# Altium PCB FOC.PcbDoc (part 1 of 2)
Units mil, origin at the board's own origin, x right, y up, seen from the top; angles counter-clockwise.
Board outline 3937.01 x 3149.61 mil, 4 copper layers (Top Layer, GND, signal layer 3, Bottom Layer), stack 23.756 mil thick; 133 components, 165 nets, 424 pads, 310 vias.
Unrouted connection lines stored in the file: 26.
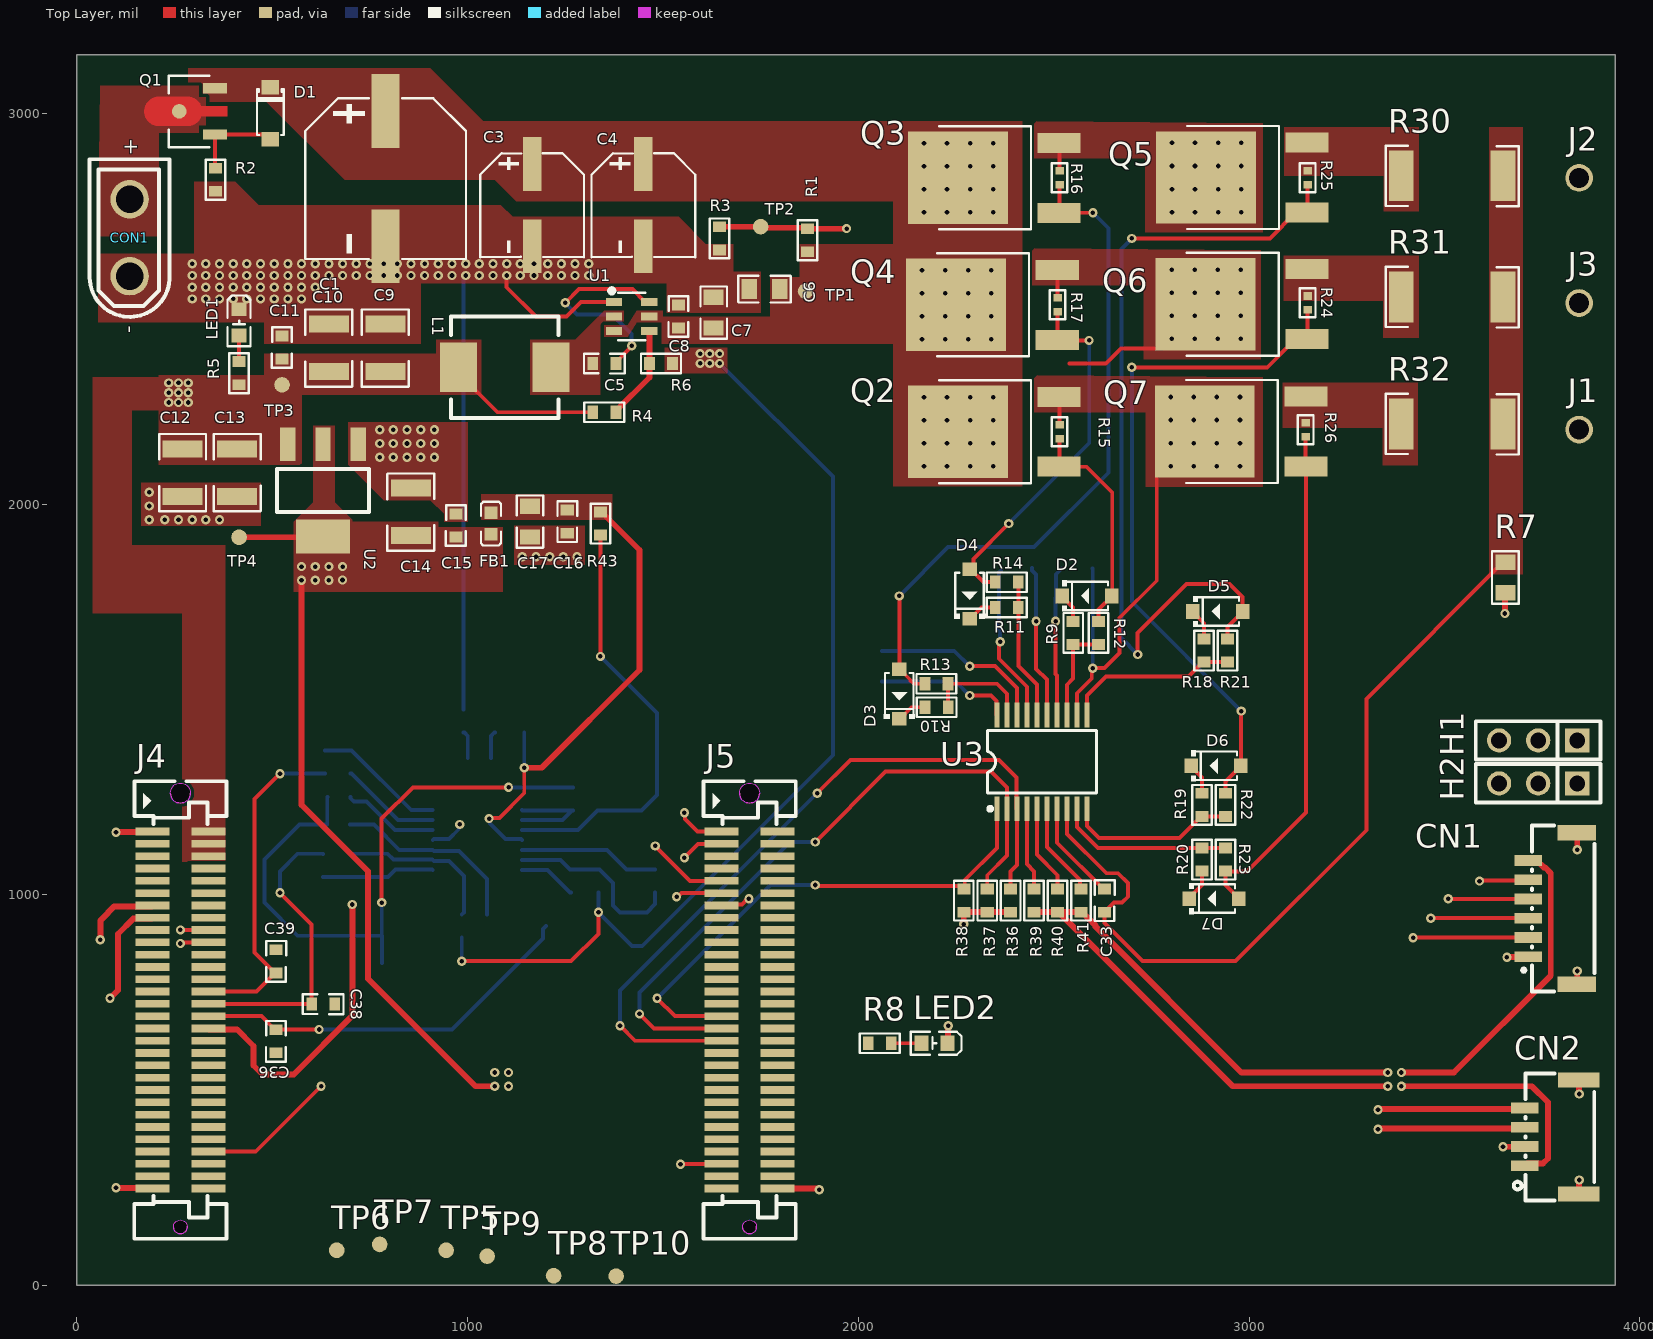
[diagram p0: Top Layer view]
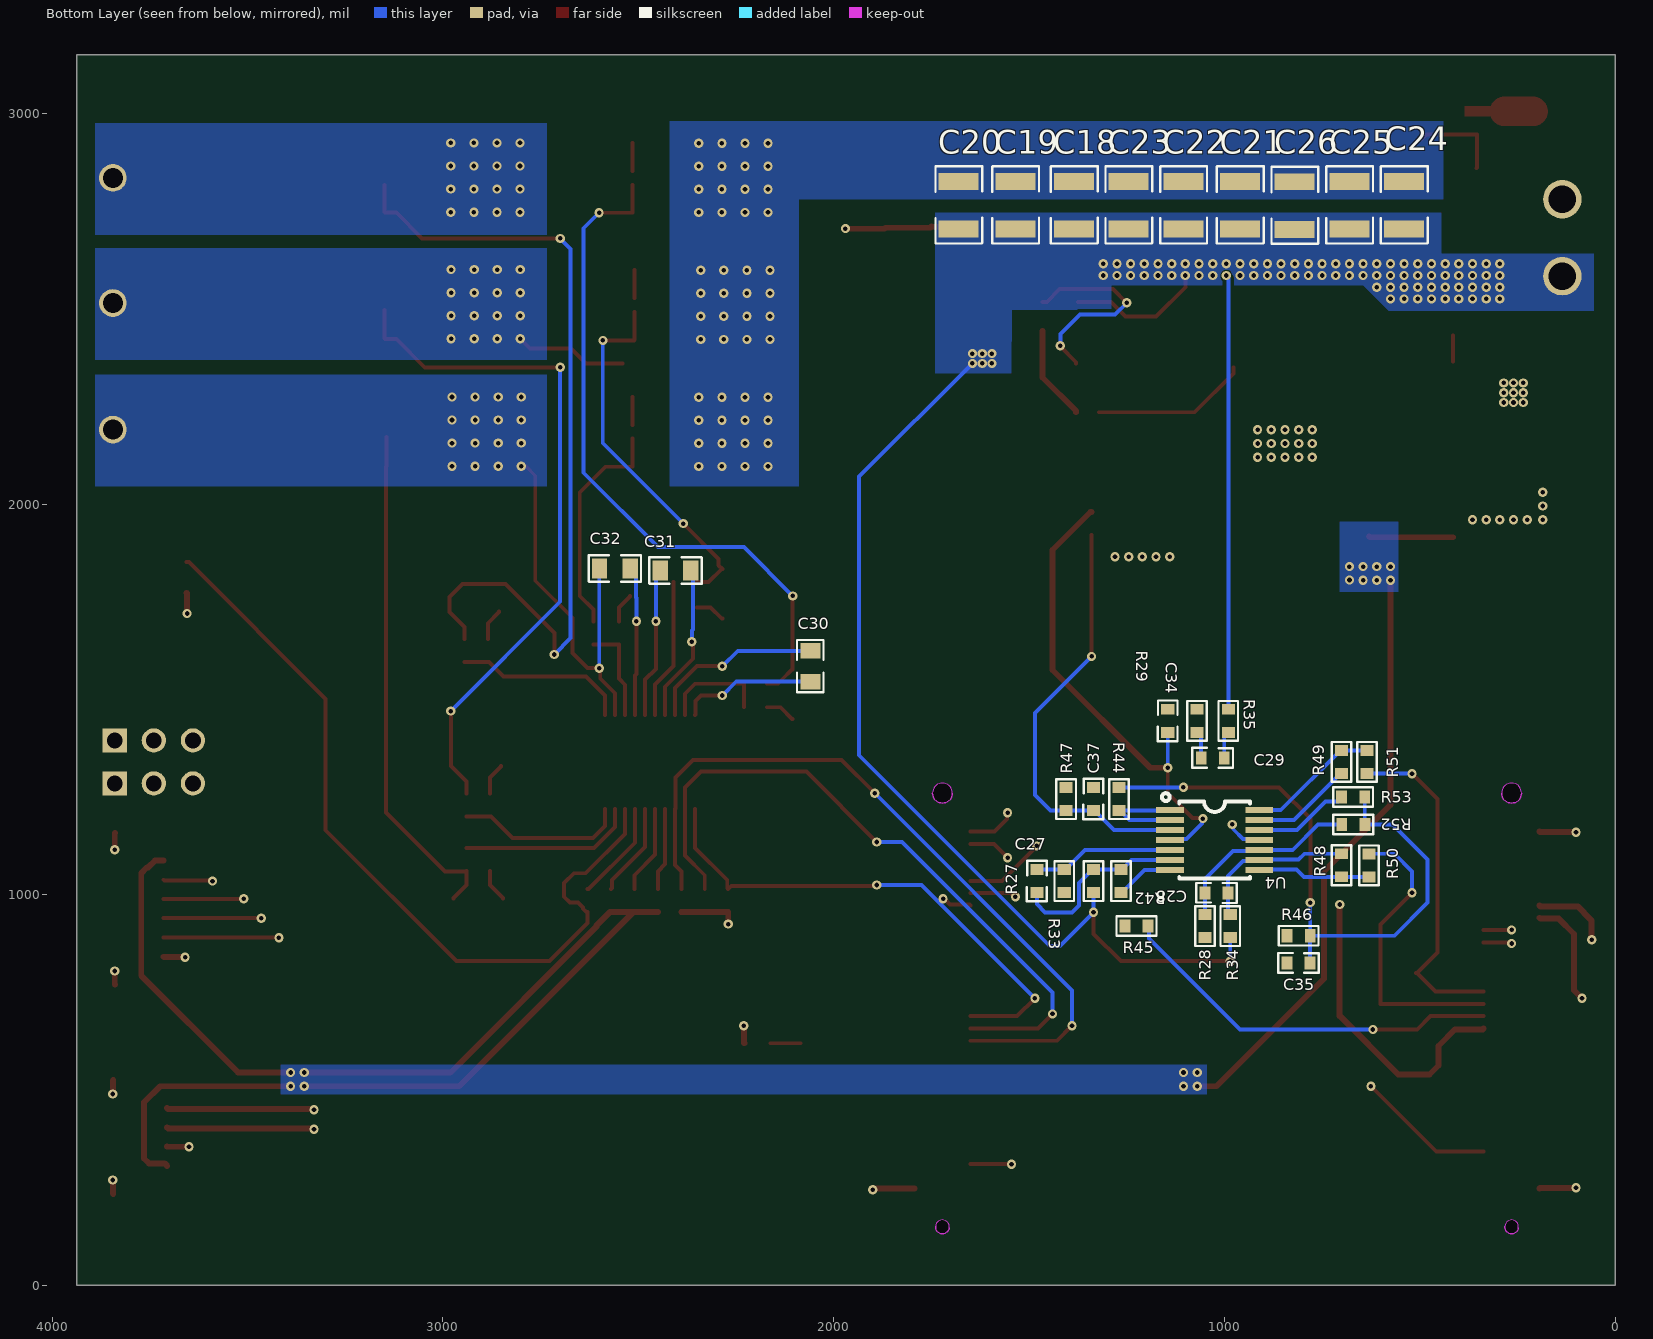
[diagram p1: Bottom Layer view, seen from below]
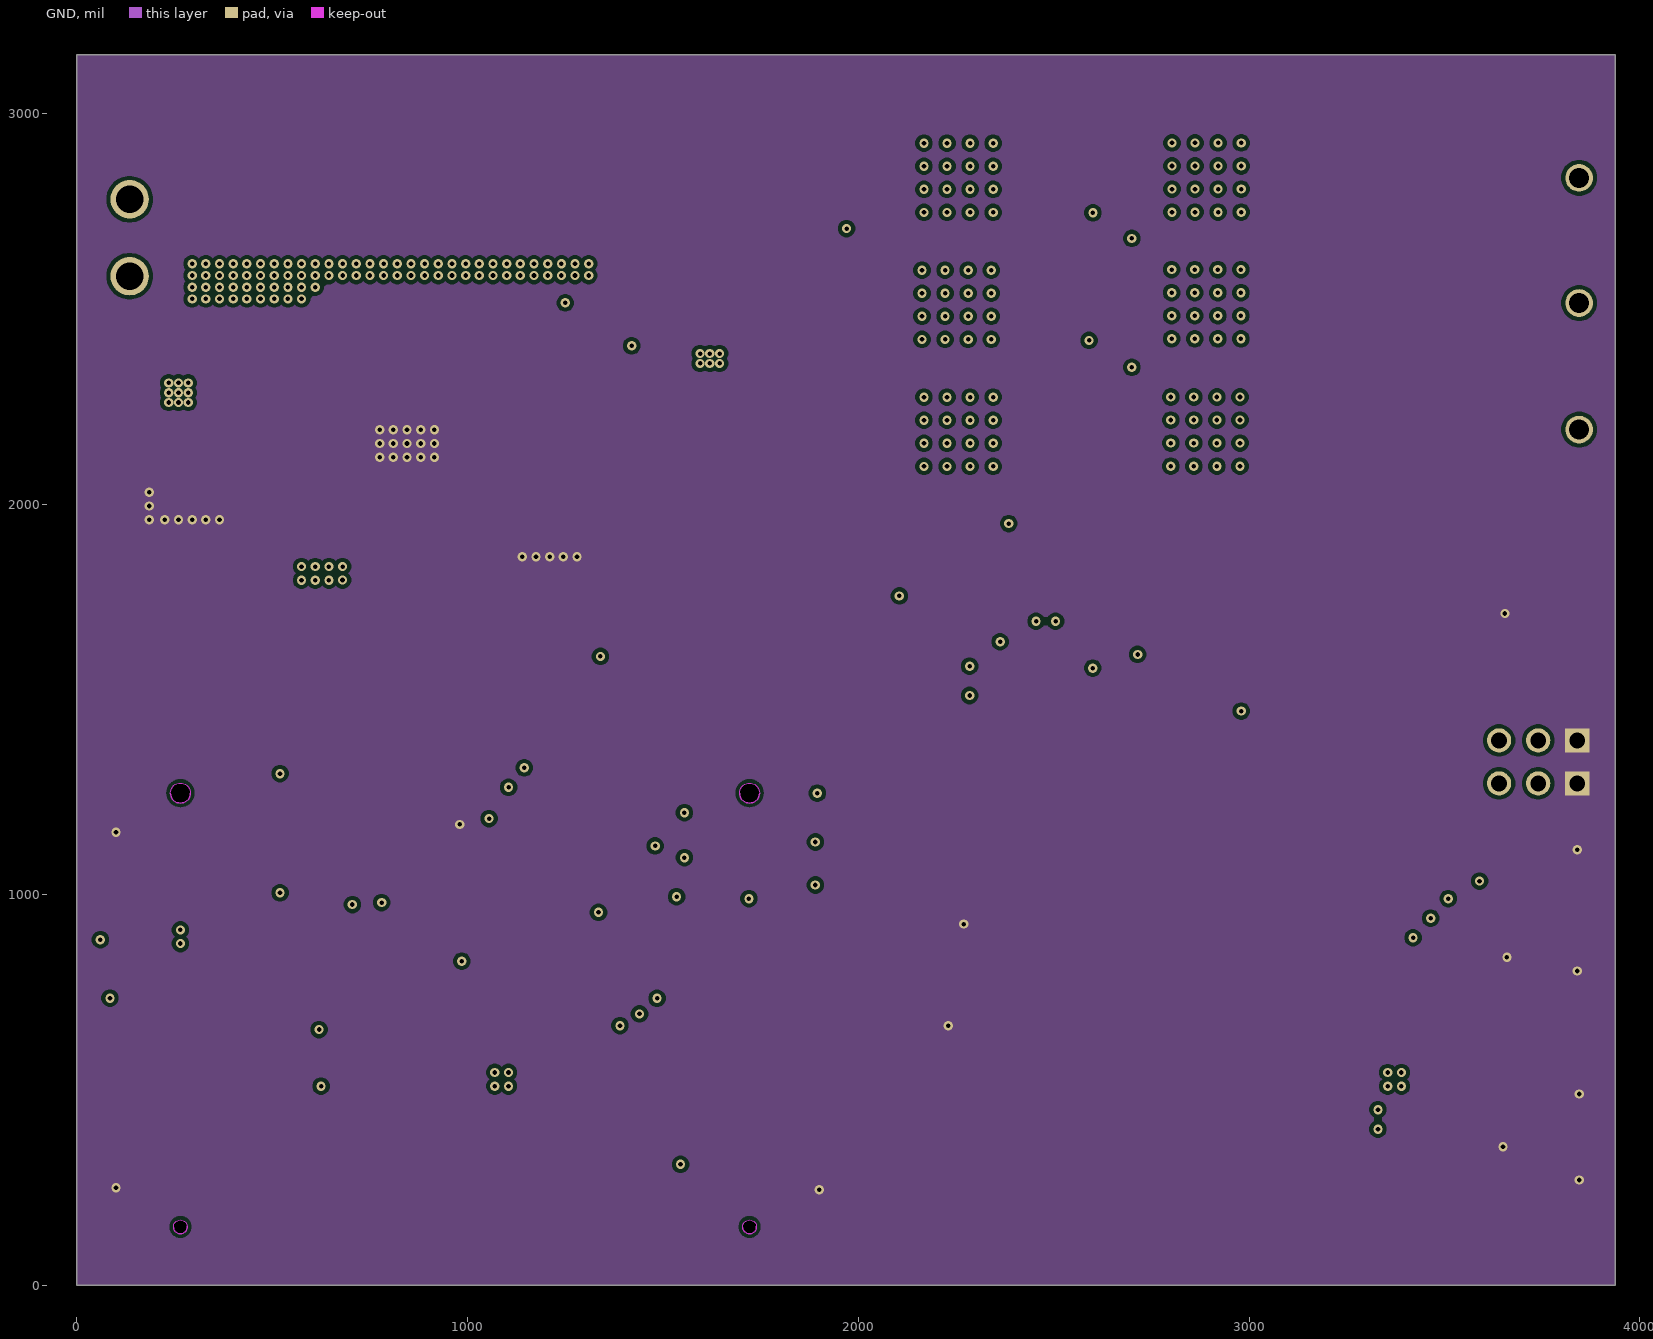
[diagram p2: GND]
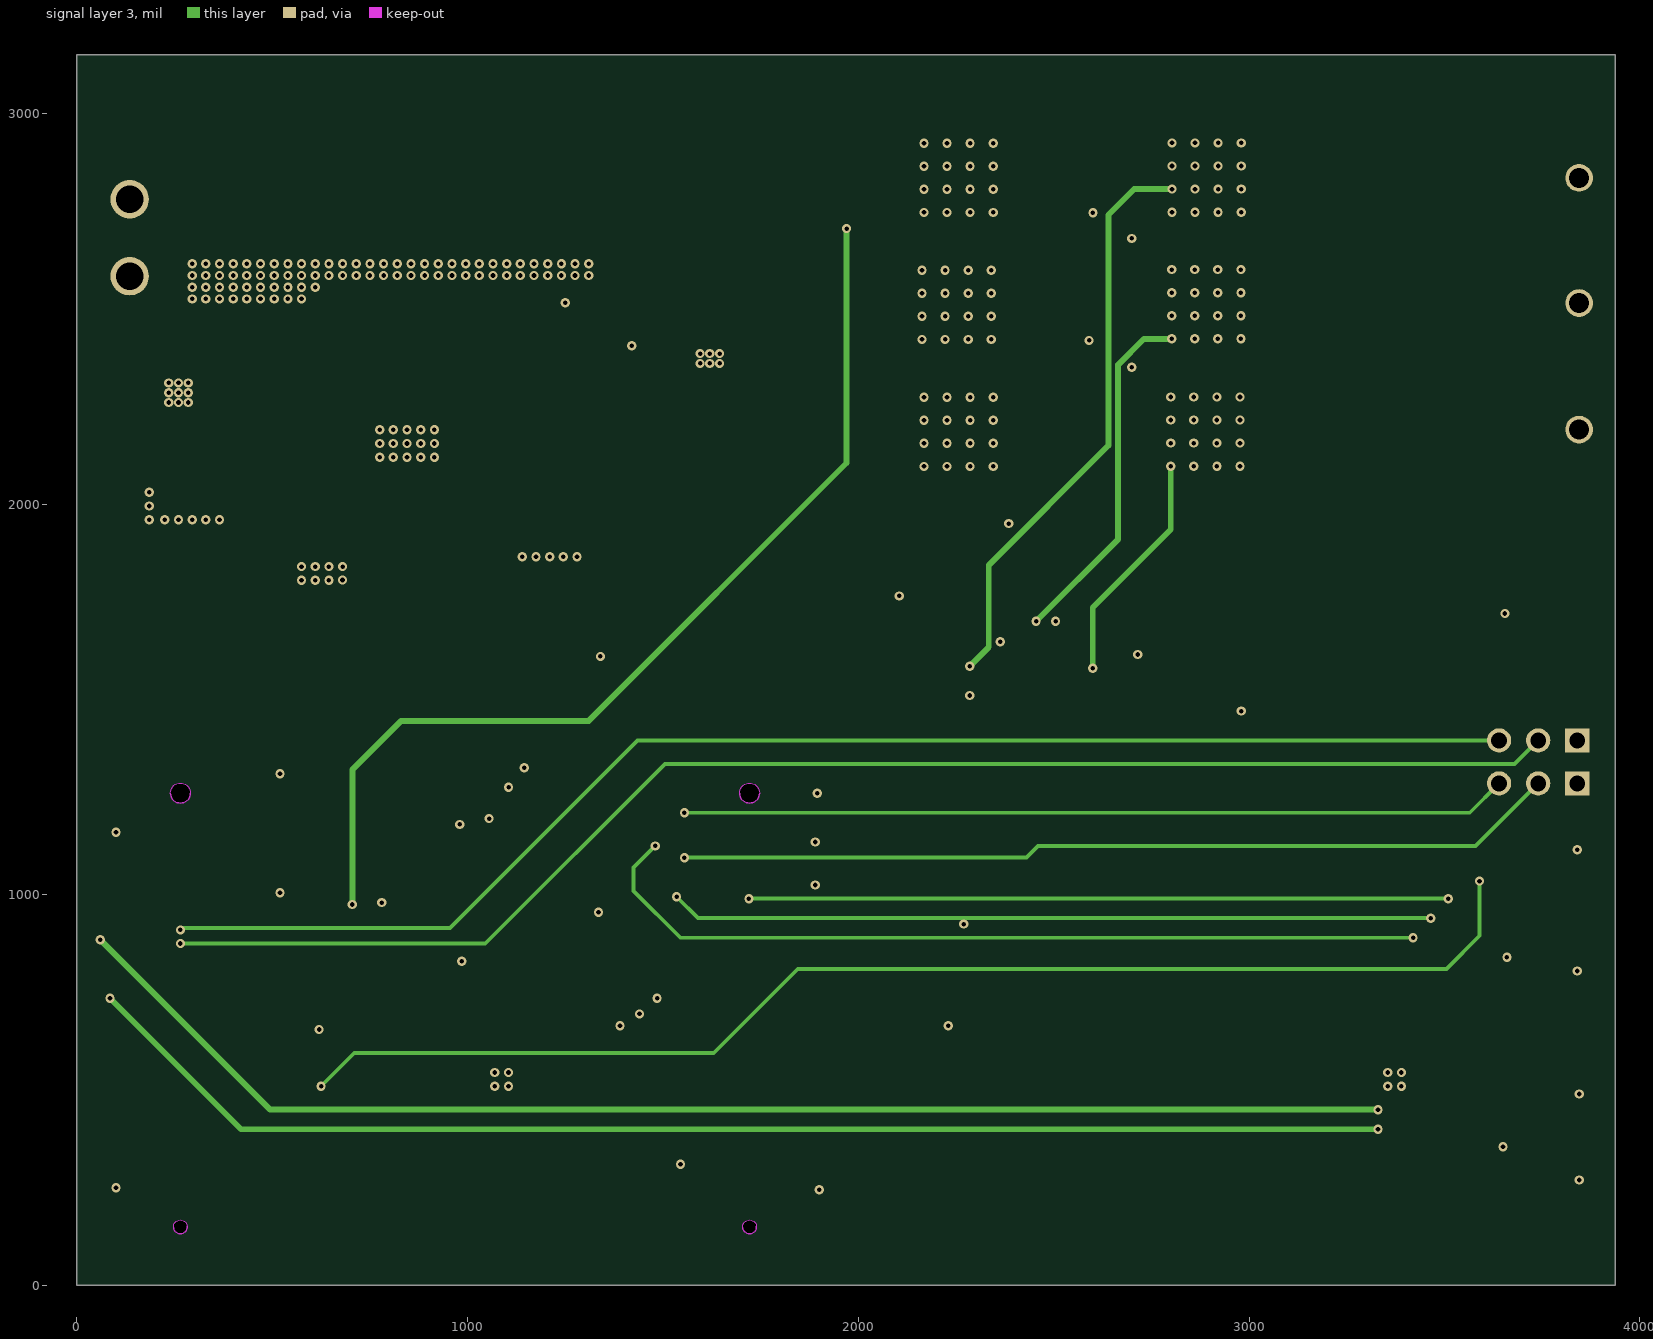
[diagram p3: signal layer 3]
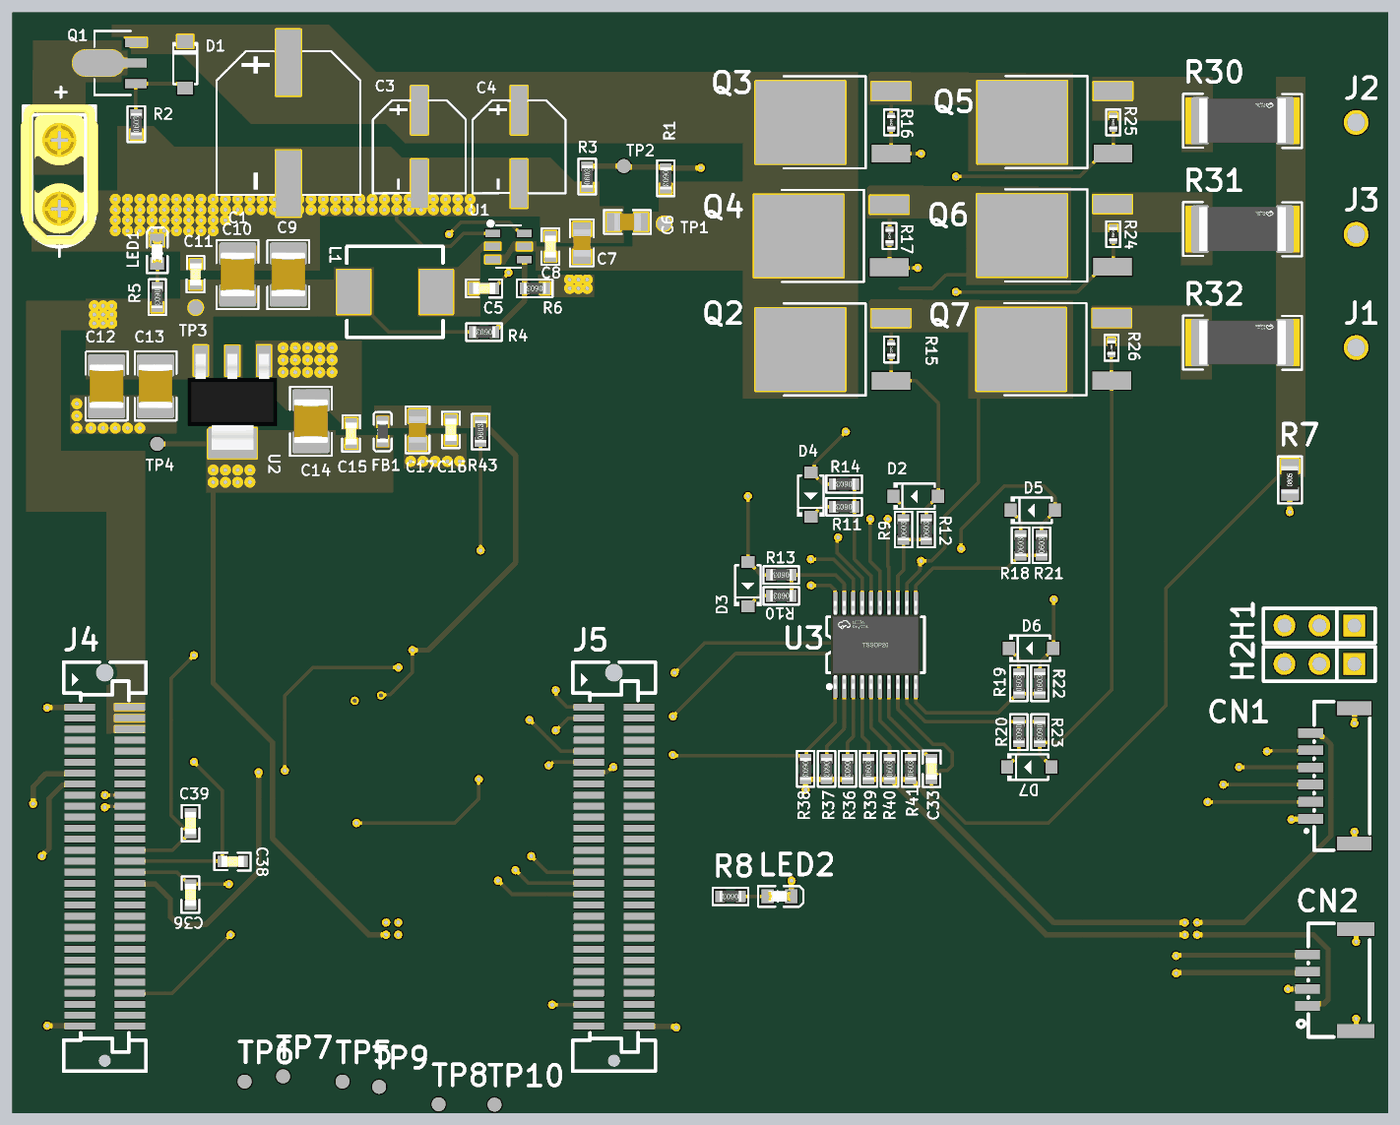
[diagram p5: 3D render of the assembled board from above, using the file's embedded part models]
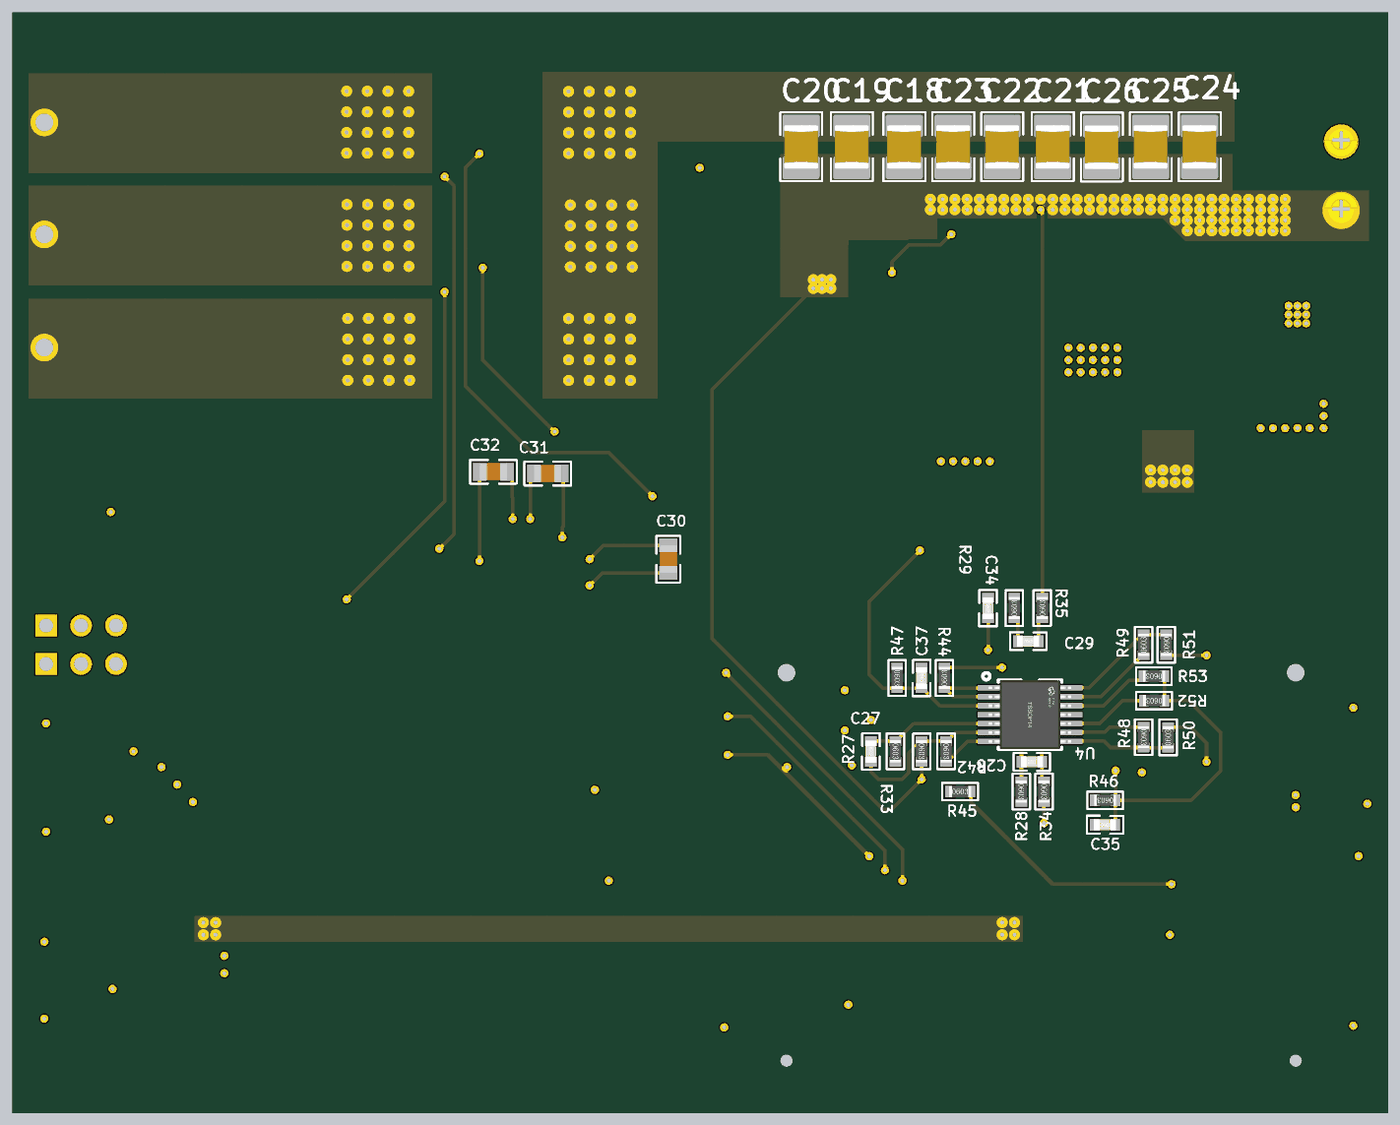
[diagram p6: 3D render of the assembled board from below, using the file's embedded part models]

## Layer stack, top to bottom
Top Solder: solder mask 0.4, Solder Resist, Dk 3.5
Top Layer: signal copper 1.4
Dielectric 2: prepreg 2.8, PP-006, Dk 4.1
GND: signal copper 1.378
Dielectric 1: dielectric 12.6, FR-4, Dk 4.8
signal layer 3: signal copper 1.378
Dielectric 3: prepreg 2.8, PP-006, Dk 4.1
Bottom Layer: signal copper 1.4
Bottom Solder: solder mask 0.4, Solder Resist, Dk 3.5

## Board outline
0,0 0,3149.61 3937.01,3149.61 3937.01,0

## Design rules (kind name [scope] priority, off if disabled: settings)
Clearance [All] p1: gap=10 ignorepadtopadclearanceinfootprint=FALSE
HoleSize [All] p1: absolutevalues=TRUE maxlimit=11.81 minlimit=11.81 maxpercent=80.000 minpercent=20.000
PolygonConnect [All] p1: connectstyle=Direct reliefconductorwidth=10 reliefentries=4 polygonreliefangle="90 Angle" airgapwidth=10
RoutingVias [All] p1: holewidth=28 width=50 viastyle="Through Hole" minholewidth=28 minwidth=50 maxholewidth=28 maxwidth=50
SolderMaskExpansion [All] p1: expansion=4 istentingtop=FALSE
SupplyNets "Schematic Supply Nets_8" [InNet('GND')] p1: voltage=0.000
SupplyNets "Schematic Supply Nets_6" [InNet('VREF')] p2: voltage=0.000
SupplyNets "Schematic Supply Nets_4" [InNet('+5V')] p3: voltage=0.000
SupplyNets "Schematic Supply Nets_3" [InNet('3V3A')] p4: voltage=0.000
SupplyNets "Schematic Supply Nets_2" [InNet('PGND')] p5: voltage=0.000
SupplyNets "Schematic Supply Nets_1" [InNet('+12V')] p6: voltage=0.000
SupplyNets "Schematic Supply Nets" [InNet('+3V3')] p7: voltage=0.000
Width [All] p1: maxlimit=20 minlimit=10 preferedwidth=10 minimp=50.000000 maximp=50.000000 favimp=50.000000
29 further rules are at their usual default settings.

## Classes and differential pairs
component class U_port: CN1 CN2 H1 H2 LED2 R8
component class U_COREBOARD: J4 J5
component class U_Power: C1 C3 C4 C5 C6 C7 C8 C9 C10 C11 C12 C13 C14 C15 C16 C17 CON1 D1 FB1 L1 LED1 Q1 R1 R2 R3 R4 R5 R6 R7 TP1 TP2 TP3 TP4 U1 U2
component class U_MOSDriver: C18 C19 C20 C21 C22 C23 C24 C25 C26 C27 C28 C29 C30 C31 C32 C33 D2 D3 D4 D5 D6 D7 J1 J2 J3 Q2 Q3 Q4 Q5 Q6 Q7 R9 R10 R11 R12 R13 R14 R15 R16 R17 R18 R19 R20 R21 R22 R23 R24 R25 R26 R27 R28 R29 R30 R31 R32 R33 R34 R35 R36 R37 R38 R39 R40 R41 TP5 TP6 TP7 TP8 TP9 TP10 U3
component class U_CurrentSamping: C34 C35 C36 C37 C38 C39 R42 R43 R44 R45 R46 R47 R48 R49 R50 R51 R52 R53 U4

## Components (designator, comment, footprint, x,y, rotation, side; value= is the part's Value field where it differs from the comment)
C1 "470uF" CAP-SMD_BD10.0-L10.3-W10.3-LS11.0-R-RD 790,2833 r90 top
C3 "100uF" CAP-SMD_BD6.3-L6.6-W6.6-LS7.2-FD_3 1165,2765 r270 top
C4 "100uF" CAP-SMD_BD6.3-L6.6-W6.6-LS7.2-FD_3 1450,2765 r270 top
C5 "100nF 20% 50V" C0603 1350,2360 r180 top
C6 "1UF 20% 50V" C0805 1760,2550 r180 top
C7 "1UF 20% 50V" C0805 1630,2490 r90 top
C8 "100nF 20% 50V" C0603 1540,2480 r90 top
C9 "22uF 20% 50V" C1210 790,2400 r90 top
C10 "22uF 20% 50V" C1210 645,2400 r90 top
C11 "100nF 20% 50V" C0603 525,2400.47 r90 top
C12 "22uF 20% 50V" C1210 270,2080 r270 top
C13 "22uF 20% 50V" C1210 410,2080 r270 top
C14 "22uF 20% 50V" C1210 855,1980 r90 top
C15 "100nF 20% 50V" C0603 970,1945 r90 top
C16 "100nF 20% 50V" C0603 1255,1955 r270 top
C17 "1UF 20% 50V" C0805 1160,1955 r270 top
C18 "10uF 20% 50V" C1210 1385,2765 r270 bottom
C19 "10uF 20% 50V" C1210 1535,2765 r270 bottom
C20 "10uF 20% 50V" C1210 1680,2765 r270 bottom
C21 "10uF 20% 50V" C1210 960,2765 r270 bottom
C22 "10uF 20% 50V" C1210 1105,2765 r270 bottom
C23 "10uF 20% 50V" C1210 1245,2765 r270 bottom
C24 "10uF 20% 50V" C1210 540,2765 r270 bottom
C25 "10uF 20% 50V" C1210 680,2765 r270 bottom
C26 "10uF 20% 50V" C1210 820,2763.98 r270 bottom
C27 "100pF 20% 50V" C0603 1480,1035 r90 bottom
C28 "100pF 20% 50V" C0603 1020,1005 r0 bottom
C29 "100pF 20% 50V" C0603 1030,1350 r180 bottom
C30 "1UF 20% 50V" C0805 2060,1585 r90 bottom
C31 "1UF 20% 50V" C0805 2405,1830 r0 bottom
C32 "1UF 20% 50V" C0805 2560,1835 r0 bottom
C33 "100nF 20% 50V" C0603 2630,985 r270 top
C34 "100nF 20% 50V" C0603 1145,1445 r90 bottom
C35 "100nF 20% 50V" C0603 810.47,825 r180 bottom
C36 "100pF 20% 50V" C0603 510,625 r90 top
C37 "100nF 20% 50V" C0603 1335,1245 r90 bottom
C38 "100pF 20% 50V" C0603 630.47,720 r180 top
C39 "100pF 20% 50V" C0603 510,829.53 r270 top
CN1 "SH-GH1.25-6PWB" SW-SMD_SH-GH1.25-6PWB 3777,964.6 r90 top
CN2 "LAIL-PHC1.25-4P-01-GH-WT" CONN-SMD_4P-P1.25_HCTL_HC-GH-4PWTKK 3775,380 r90 top
CON1 "XT30UPB-M" CONN-TH_XT30UPB-M 135,2681.6 r90 top
D1 "BZT52C10" SOD-123_L2.8-W1.8-LS3.7-RD 495,3000 r270 top
D2 "1N4148W" SOD-123_L2.7-W1.6-LS3.7-FD 2585,1765 r180 top
D3 "1N4148W" SOD-123_L2.7-W1.6-LS3.7-FD 2105,1513.4 r270 top
D4 "1N4148W" SOD-123_L2.7-W1.6-LS3.7-FD 2285,1770 r270 top
D5 "1N4148W" SOD-123_L2.7-W1.6-LS3.7-FD 2920,1725 r180 top
D6 "1N4148W" SOD-123_L2.7-W1.6-LS3.7-FD 2915,1330 r180 top
D7 "1N4148W" SOD-123_L2.7-W1.6-LS3.7-FD 2910,990 r180 top
FB1 "120Ω@100MHz" FB_0603 1060,1950 r90 top value=220Ω@100MHz
H1 "HDR-F_2.54_1x3P" HDR-TH_3P-P2.54-V-F 3740,1395 r180 top
H2 "HDR-F_2.54_1x3P" HDR-TH_3P-P2.54-V-F 3740,1285 r180 top
J1 "Bat+" VIAD1.8M1.3MM 3856.06,2250.97 r0 top
J2 "Bat+" VIAD1.8M1.3MM 3856.06,2895.41 r0 top
J3 "Bat+" VIAD1.8M1.3MM 3856.06,2574.85 r0 top
J4 "3710F60037G0FR01" CONN-TH_60P-P0.80_3710F60037G0FR01 265,705 r270 top
J5 "3710F60037G0FR01" CONN-TH_60P-P0.80_3710F60037G0FR01 1721.7,705 r270 top
L1 "6.8uH" IND-SMD_L7.0-W6.6 1095,2350 r180 top
LED1 "XL-J1608SYGC-06" LED0603-FD_GREEN 415,2465 r90 top
LED2 "XL-J1608SYGC-06" LED0603-FD_GREEN 2195,620 r0 top
Q1 "HV04P440S" SOT-89-3_L4.5-W2.4-P1.50-LS4.0-BR 300,3005 r0 top
Q2 "AOD4184A" TO-252-2_L6.6-W6.1-P4.57-LS9.9-TL-CW 2384.6,2185 r180 top
Q3 "AOD4184A" TO-252-2_L6.6-W6.1-P4.57-LS9.9-TL-CW 2384.6,2835 r180 top
Q4 "AOD4184A" TO-252-2_L6.6-W6.1-P4.57-LS9.9-TL-CW 2379.6,2510 r180 top
Q5 "AOD4184A" TO-252-2_L6.6-W6.1-P4.57-LS9.9-TL-CW 3019.37,2835.66 r180 top
Q6 "AOD4184A" TO-252-2_L6.6-W6.1-P4.57-LS9.9-TL-CW 3018.56,2511.46 r180 top
Q7 "AOD4184A" TO-252-2_L6.6-W6.1-P4.57-LS9.9-TL-CW 3016.31,2185.46 r180 top
R1 "47kΩ 1%" R0603 1870,2675 r270 top
R2 "10kΩ 1%" R0603 355,2830 r90 top
R3 "4.7kΩ 1%" R0603 1645,2680 r90 top
R4 "100kΩ 1%" R0603 1350,2235 r180 top
R5 "10kΩ 1%" R0603 415,2335 r270 top
R6 "13.7kΩ 1%" R0603 1495,2360 r180 top
R7 "0Ω 1%" R0805 3656.01,1811.99 r90 top
R8 "10kΩ 1%" R0603 2055,620 r180 top
R9 "47Ω 1%" R0603 2550,1670 r90 top
R10 "47Ω 1%" R0603 2200.47,1480 r180 top
R11 "47Ω 1%" R0603 2380,1735 r180 top
R12 "20Ω 1%" R0603 2615,1670 r90 top
R13 "20Ω 1%" R0603 2200,1540 r180 top
R14 "20Ω 1%" R0603 2380,1800 r180 top
R15 "10kΩ 1%" R0402 2515,2185 r270 top
R16 "10kΩ 1%" R0402 2515,2835 r270 top
R17 "10kΩ 1%" R0402 2510,2510 r270 top
R18 "47Ω 1%" R0603 2885,1625 r90 top
R19 "47Ω 1%" R0603 2880,1230 r90 top
R20 "47Ω 1%" R0603 2880,1090 r270 top
R21 "20Ω 1%" R0603 2945,1625 r90 top
R22 "20Ω 1%" R0603 2940,1230 r90 top
R23 "20Ω 1%" R0603 2940,1090 r270 top
R24 "10kΩ 1%" R0402 3150,2515 r270 top
R25 "10kΩ 1%" R0402 3150,2835 r270 top
R26 "10kΩ 1%" R0402 3145,2190 r270 top
R27 "1kΩ 1%" R0603 1410,1035 r270 bottom
R28 "1kΩ 1%" R0603 1050,920 r270 bottom
R29 "1kΩ 1%" R0603 1070,1445 r90 bottom
R30 "20mΩ 1% 3W" R2512 3520,2840 r180 top
R31 "20mΩ 1% 3W" R2512 3520,2530 r180 top
R32 "20mΩ 1% 3W" R2512 3520,2205 r180 top
R33 "1kΩ 1%" R0603 1335,1035 r270 bottom
R34 "1kΩ 1%" R0603 985,920 r270 bottom
R35 "1kΩ 1%" R0603 990,1445 r90 bottom
R36 "10kΩ 1%" R0603 2390,985 r270 top
R37 "10kΩ 1%" R0603 2330,985 r270 top
R38 "10kΩ 1%" R0603 2270,985 r270 top
R39 "10kΩ 1%" R0603 2450,985 r90 top
R40 "10kΩ 1%" R0603 2510,985 r90 top
R41 "10kΩ 1%" R0603 2570,985 r90 top
R42 "20kΩ 1%" R0603 1265,1035 r270 bottom
R43 "10kΩ 1%" R0603 1340,1950 r90 top
R44 "100Ω 1%" R0603 1270,1245 r90 bottom
R45 "100Ω 1%" R0603 1225,920 r180 bottom
R46 "20kΩ 1%" R0603 810,895 r0 bottom
R47 "10kΩ 1%" R0603 1405,1245 r270 bottom
R48 "20kΩ 1%" R0603 700,1075.47 r270 bottom
R49 "20kΩ 1%" R0603 700,1340 r90 bottom
R50 "100Ω 1%" R0603 630,1075 r90 bottom
R51 "100Ω 1%" R0603 635,1340 r270 bottom
R52 "20kΩ 1%" R0603 670,1180 r0 bottom
R53 "20kΩ 1%" R0603 670.47,1250 r0 bottom
TP1 "TestPoint" TP-40 1865,2545 r90 top
TP2 "TestPoint" TP-40 1750,2710 r90 top
TP3 "TestPoint" TP-40 525,2305 r90 top
TP4 "TestPoint" TP-40 415,1915 r90 top
TP5 "TestPoint" TP-40 945,90 r90 top
TP6 "TestPoint" TP-40 665,90 r90 top
TP7 "TestPoint" TP-40 775,105 r90 top
TP8 "TestPoint" TP-40 1220,25 r90 top
TP9 "TestPoint" TP-40 1050,75 r90 top
TP10 "TestPoint" TP-40 1380,24 r90 top
U1 "LMR51430XDDCR" SOT-23-6_L2.9-W1.6-P0.95-LS2.8-BL 1420,2480 r270 top
U2 "AMS1117-3.3" SOT-223 630,2035 r90 top
U3 "SD6287" TSSOP-20 2470,1340 r90 top
U4 "GS8634-TR" SOP-14_L5.0-W4.4-P0.65-LS6.4-BL 1025,1140 r270 bottom

## Footprints (in the part's own frame and the unit in brackets; to place one, negate y for a bottom-side part, rotate by r counter-clockwise, add the part's x,y. Pads: shape width x height; smd on the part's side, far side on the other; paste and mask are expansions set on the pad)
C0603 [mm]
  rect 0.7x0.85 smd: 1(-0.75,0) 2(0.75,0)
  silkscreen extent -1.32,-0.64 1.32,0.66, body extent -0.81,-0.4 0.79,0.4, height 0.45
C0805 [mm]
  rect 1x1.3 smd: 1(-1,0) 2(1,0)
  silkscreen extent -1.7,-0.86 1.7,0.86, body extent -1,-0.63 1,0.62, height 0.6
C1210 [mm]
  rect 1.1x2.6 smd paste-100 mask+0.051: 1(-1.55,0) 2(1.55,0)
  silkscreen extent -2.52,-1.51 2.49,1.54, body extent -1.6,-1.25 1.6,1.25, height 2.45
CAP-SMD_BD6.3-L6.6-W6.6-LS7.2-FD_3 [mil]
  rect 137.8x47.2 smd: 1(-105.1,0) 2(105.1,0)
  silkscreen extent -133,-133 133,133
CAP-SMD_BD10.0-L10.3-W10.3-LS11.0-R-RD [mil]
  rect 189x70.9 smd: 1(173,0) 2(-173,0)
  silkscreen extent -206,-206 206,206
CONN-SMD_4P-P1.25_HCTL_HC-GH-4PWTKK [mil]
  rect 27.6x70.9 smd paste+0 mask+2: 1(-73.8,68.9) 2(-24.6,68.9) 3(24.7,68.9) 4(73.9,68.9)
  rect 39.4x106.3 smd paste+0 mask+2: 5(145.9,-68.9) 6(-145.8,-68.9)
  silkscreen extent -162,-109 162,97
CONN-TH_60P-P0.80_3710F60037G0FR01 [mm]
  rect 0.5x2.22 smd paste+0 mask+0.051: 1(-11.6,-1.821) 2(-10.8,-1.821) 3(-10,-1.821) 4(-9.2,-1.821) 5(-8.4,-1.821) 6(-7.6,-1.821) 7(-6.8,-1.821) 8(-5.999,-1.821) 9(-5.199,-1.821) 10(-4.399,-1.821) 11(-3.599,-1.821) 12(-2.799,-1.821) 13(-2.002,-1.821) 14(-1.201,-1.821) 15(-0.399,-1.821) 16(0.399,-1.821) 17(1.199,-1.821) 18(1.999,-1.821) 19(2.799,-1.821) 20(3.599,-1.821) 21(4.399,-1.821) 22(5.199,-1.821) 23(5.999,-1.821) 24(6.8,-1.821) 25(7.6,-1.821) 26(8.4,-1.821) 27(9.2,-1.821) 28(10,-1.821) 29(10.8,-1.821) 30(11.6,-1.821) 31(11.6,1.819) 32(10.8,1.819) 33(10,1.819) 34(9.2,1.819) 35(8.4,1.819) 36(7.6,1.819) 37(6.8,1.819) 38(5.999,1.819) 39(5.199,1.819) 40(4.399,1.819) 41(3.599,1.819) 42(2.799,1.819) 43(1.999,1.819) 44(1.199,1.819) 45(0.401,1.819) 46(-0.399,1.819) 47(-1.199,1.819) 48(-1.999,1.819) 49(-2.799,1.819) 50(-3.599,1.819) 51(-4.399,1.819) 52(-5.199,1.819) 53(-5.999,1.819) 54(-6.8,1.819) 55(-7.6,1.819) 56(-8.4,1.819) 57(-9.2,1.819) 58(-10,1.819) 59(-10.8,1.819) 60(-11.6,1.819)
  Keep-Out Layer board cut-out: 14.549,0 14.539,-0.094 14.511,-0.183 14.463,-0.264 14.402,-0.335 14.326,-0.391 14.239,-0.429 14.148,-0.447 14.054,-0.447 13.96,-0.429 13.876,-0.391 13.8,-0.335 13.736,-0.264 13.688,-0.183 13.66,-0.094 13.65,0 13.66,0.094 13.688,0.183 13.736,0.264 13.8,0.333 13.876,0.389 13.96,0.427 14.054,0.447 14.148,0.447 14.239,0.427 14.326,0.389 14.402,0.333 14.463,0.264 14.511,0.183 14.539,0.094 14.549,0
  Keep-Out Layer board cut-out: -13.449,0 -13.459,-0.114 -13.49,-0.224 -13.538,-0.325 -13.602,-0.419 -13.683,-0.498 -13.774,-0.564 -13.879,-0.612 -13.988,-0.64 -14.1,-0.65 -14.214,-0.64 -14.323,-0.612 -14.425,-0.564 -14.519,-0.498 -14.597,-0.419 -14.663,-0.325 -14.712,-0.224 -14.74,-0.114 -14.75,0 -14.74,0.112 -14.712,0.221 -14.663,0.325 -14.597,0.417 -14.519,0.498 -14.425,0.561 -14.323,0.61 -14.214,0.64 -14.1,0.65 -13.988,0.64 -13.879,0.61 -13.774,0.561 -13.683,0.498 -13.602,0.417 -13.538,0.325 -13.49,0.221 -13.459,0.112 -13.449,0
  Keep-Out Layer region: 14.549,0 14.539,-0.094 14.511,-0.183 14.463,-0.264 14.402,-0.335 14.326,-0.391 14.239,-0.429 14.148,-0.447 14.054,-0.447 13.96,-0.429 13.876,-0.391 13.8,-0.335 13.736,-0.264 13.688,-0.183 13.66,-0.094 13.65,0 13.66,0.094 13.688,0.183 13.736,0.264 13.8,0.333 13.876,0.389 13.96,0.427 14.054,0.447 14.148,0.447 14.239,0.427 14.326,0.389 14.402,0.333 14.463,0.264 14.511,0.183 14.539,0.094 14.549,0
  Keep-Out Layer region: 14.549,0 14.539,-0.094 14.511,-0.183 14.463,-0.264 14.402,-0.335 14.326,-0.391 14.239,-0.429 14.148,-0.447 14.054,-0.447 13.96,-0.429 13.876,-0.391 13.8,-0.335 13.736,-0.264 13.688,-0.183 13.66,-0.094 13.65,0 13.66,0.094 13.688,0.183 13.736,0.264 13.8,0.333 13.876,0.389 13.96,0.427 14.054,0.447 14.148,0.447 14.239,0.427 14.326,0.389 14.402,0.333 14.463,0.264 14.511,0.183 14.539,0.094 14.549,0
  Keep-Out Layer region: -13.449,0 -13.459,-0.114 -13.49,-0.224 -13.538,-0.325 -13.602,-0.419 -13.683,-0.498 -13.774,-0.564 -13.879,-0.612 -13.988,-0.64 -14.1,-0.65 -14.214,-0.64 -14.323,-0.612 -14.425,-0.564 -14.519,-0.498 -14.597,-0.419 -14.663,-0.325 -14.712,-0.224 -14.74,-0.114 -14.75,0 -14.74,0.112 -14.712,0.221 -14.663,0.325 -14.597,0.417 -14.519,0.498 -14.425,0.561 -14.323,0.61 -14.214,0.64 -14.1,0.65 -13.988,0.64 -13.879,0.61 -13.774,0.561 -13.683,0.498 -13.602,0.417 -13.538,0.325 -13.49,0.221 -13.459,0.112 -13.449,0
  Keep-Out Layer region: -13.449,0 -13.459,-0.114 -13.49,-0.224 -13.538,-0.325 -13.602,-0.419 -13.683,-0.498 -13.774,-0.564 -13.879,-0.612 -13.988,-0.64 -14.1,-0.65 -14.214,-0.64 -14.323,-0.612 -14.425,-0.564 -14.519,-0.498 -14.597,-0.419 -14.663,-0.325 -14.712,-0.224 -14.74,-0.114 -14.75,0 -14.74,0.112 -14.712,0.221 -14.663,0.325 -14.597,0.417 -14.519,0.498 -14.425,0.561 -14.323,0.61 -14.214,0.64 -14.1,0.65 -13.988,0.64 -13.879,0.61 -13.774,0.561 -13.683,0.498 -13.602,0.417 -13.538,0.325 -13.49,0.221 -13.459,0.112 -13.449,0
  Keep-Out Layer lines w0.003: -14.1,-0.65 -14.214,-0.64 -14.323,-0.612 -14.425,-0.564 -14.519,-0.498 -14.597,-0.419 -14.663,-0.325 -14.712,-0.224 -14.74,-0.114 -14.75,0 -14.74,0.112 -14.712,0.221 -14.663,0.325 -14.597,0.417 -14.519,0.498 -14.425,0.561 -14.323,0.61 -14.214,0.64 -14.1,0.65 -13.988,0.64 -13.879,0.61 -13.774,0.561 -13.683,0.498 -13.602,0.417 -13.538,0.325 -13.49,0.221 -13.459,0.112 -13.449,0 -13.459,-0.114 -13.49,-0.224 -13.538,-0.325 -13.602,-0.419 -13.683,-0.498 -13.774,-0.564 -13.879,-0.612 -13.988,-0.64 -14.1,-0.65 ; 14.148,-0.447 14.054,-0.447 13.96,-0.429 13.876,-0.391 13.8,-0.335 13.736,-0.264 13.688,-0.183 13.66,-0.094 13.65,0 13.66,0.094 13.688,0.183 13.736,0.264 13.8,0.333 13.876,0.389 13.96,0.427 14.054,0.447 14.148,0.447 14.239,0.427 14.326,0.389 14.402,0.333 14.463,0.264 14.511,0.183 14.539,0.094 14.549,0 14.539,-0.094 14.511,-0.183 14.463,-0.264 14.402,-0.335 14.326,-0.391 14.239,-0.429 14.148,-0.447
  silkscreen extent -14.87,-3 14.87,3
CONN-TH_XT30UPB-M [mil]
  round 98.4 hole 70.9: 1(-98.4,0) 2(98.4,0)
  silkscreen extent -202,-102 201,102, body extent -196,-110 205,110, height 420
FB_0603 [mm]
  rect 0.8x0.864 smd paste-100 mask+0.051: 1(-0.7,0) 2(0.7,0)
  silkscreen extent -1.42,-0.65 1.42,0.65, body extent -0.8,-0.4 0.8,0.4, height 0.5
HDR-TH_3P-P2.54-V-F [mil]
  rect 62x62 hole 40.2: 1(-100,0)
  round 62 hole 40.2: 2(0,0) 3(100,0)
  silkscreen extent -160,-49 160,49
IND-SMD_L7.0-W6.6 [mil]
  rect 94.5x126 smd: 1(-118.1,0) 2(118.2,0)
  silkscreen extent -138,-130 138,130
LED0603-FD_GREEN [mm]
  rect 0.9x1 smd: 1(-0.85,0) 2(0.85,0)
  silkscreen extent -1.55,-0.75 1.75,0.75, body extent -0.8,-0.41 0.8,0.41, height 0.7
R0402 [mm]
  rect 0.5x0.55 smd: 1(-0.45,0) 2(0.45,0)
  silkscreen extent -0.94,-0.51 0.94,0.51, body extent -0.52,-0.3 0.52,0.3, height 0.34
R0603 [mm]
  rect 0.7x0.85 smd: 1(-0.75,0) 2(0.75,0)
  silkscreen extent -1.3,-0.64 1.3,0.64, body extent -0.8,-0.41 0.8,0.39, height 0.45
R0805 [mm]
  rect 1x1.3 smd: 1(-1,0) 2(1,0)
  silkscreen extent -1.7,-0.86 1.7,0.86, body extent -1,-0.6 1,0.65, height 0.47
R2512 [mm]
  rect 1.6x3.3 smd paste-100 mask+0.051: 1(-3.3,0) 2(3.3,0)
  silkscreen extent -4.32,-1.96 4.32,1.98, body extent -3.15,-1.6 3.15,1.6, height 0.61
SOD-123_L2.7-W1.6-LS3.7-FD [mil]
  rect 34.6x37.8 smd: 1(-63.4,0) 2(63.4,0)
  silkscreen extent -54,-39 63,39
SOD-123_L2.8-W1.8-LS3.7-RD [mil]
  rect 37.4x45.3 smd: 1(-66.6,0) 2(66.7,0)
  silkscreen extent -62,-34 55,34
SOP-14_L5.0-W4.4-P0.65-LS6.4-BL [mm]
  rect 0.4x1.8 smd: 1(-1.95,-2.9) 2(-1.3,-2.9) 3(-0.65,-2.9) 4(0,-2.9) 5(0.65,-2.9) 6(1.3,-2.9) 7(1.95,-2.9) 8(1.95,2.9) 9(1.3,2.9) 10(0.65,2.9) 11(0,2.9) 12(-0.65,2.9) 13(-1.3,2.9) 14(-1.95,2.9)
  silkscreen extent -3.05,-3.43 2.5,2.3, body extent -2.5,-3.01 2.5,3.01, height 1.1
SOT-23-6_L2.9-W1.6-P0.95-LS2.8-BL [mil]
  rect 20.9x42.2 smd: 1(-37.4,-45.3) 2(0,-45.3) 3(37.4,-45.3) 4(37.4,45.2) 5(0,45.2) 6(-37.4,45.2)
  silkscreen extent -72,-57 61,35
SOT-89-3_L4.5-W2.4-P1.50-LS4.0-BR [mil]
  rect 62x26.5 smd: 1(53.4,-59.1) 3(53.4,59)
  round 37.4 smd: 2(-38.1,0)
  Top Layer region: -89.9,37.4 -16.9,37.4 -15.2,37.3 -13.4,37.2 -11.7,37 -9.9,36.7 -8.2,36.4 -6.5,35.9 -4.9,35.4 -3.2,34.8 -1.6,34.1 0,33.3 1.5,32.5 3,31.6 4.5,30.6 5.9,29.6 7.3,28.5 8.6,27.3 9.8,26.1 11,24.8 12.2,23.5 13.2,22.1 14.3,20.7 15.2,19.2 16.1,17.7 16.8,16.1 17.6,13 84.4,13 84.4,-13 17.6,-13 16.8,-16.1 16.1,-17.7 15.2,-19.2 14.3,-20.7 13.2,-22.1 12.2,-23.5 11,-24.9 9.8,-26.2 8.6,-27.4 7.3,-28.5 5.9,-29.6 4.5,-30.7 3,-31.7 1.5,-32.6 0,-33.4 -1.6,-34.1 -3.2,-34.8 -4.9,-35.4 -6.5,-36 -8.2,-36.4 -9.9,-36.8 -11.7,-37.1 -13.4,-37.3 -15.2,-37.4 -16.9,-37.4 -89.9,-37.4 -91.7,-37.4 -93.4,-37.3 -95.2,-37.1 -96.9,-36.8 -98.6,-36.4 -100.3,-36 -102,-35.4 -103.6,-34.8 -105.2,-34.1 -106.8,-33.4 -108.4,-32.6 -109.9,-31.7 -111.3,-30.7 -112.7,-29.6 -114.1,-28.5 -115.4,-27.4 -116.7,-26.2 -117.9,-24.9 -119,-23.5 -120.1,-22.1 -121.1,-20.7 -122,-19.2 -122.9,-17.7 -123.7,-16.1 -124.4,-14.5 -125,-12.9 -125.6,-11.2 -126.1,-9.6 -126.5,-7.9 -126.8,-6.1 -127.1,-4.4 -127.2,-2.6 -127.3,-0.9 -127.3,0.9 -127.2,2.6 -127.1,4.4 -126.8,6.1 -126.5,7.8 -126.1,9.5 -125.6,11.2 -125,12.9 -124.4,14.5 -123.7,16.1 -122.9,17.7 -122,19.2 -121.1,20.7 -120.1,22.1 -119,23.5 -117.9,24.8 -116.7,26.1 -115.4,27.3 -114.1,28.5 -112.7,29.6 -111.3,30.6 -109.9,31.6 -108.4,32.5 -106.8,33.3 -105.2,34.1 -103.6,34.8 -102,35.4 -100.3,35.9 -98.6,36.4 -96.9,36.7 -95.2,37 -93.4,37.2 -91.7,37.3 -89.9,37.4
  silkscreen extent -65,-92 40,92
SOT-223 [mm]
  rect 2.2x1 smd: 1(3,-2.3) 2(3,0) 3(3,2.3)
  rect 2.2x3.5 smd: 2(-3,0)
  silkscreen extent -1.4,-3 1.4,3, body extent -3.49,-3.24 3.49,3.24, height 1.64
SW-SMD_SH-GH1.25-6PWB [mil]
  rect 27.6x70.9 smd: 1(-123.1,62) 2(-73.9,62) 3(-24.6,62) 4(24.6,62) 5(73.8,62) 6(123,62)
  rect 39.4x98.4 smd: 7(193.9,-62) 8(-193.9,-62)
  silkscreen extent -213,-107 213,83
TO-252-2_L6.6-W6.1-P4.57-LS9.9-TL-CW [mil]
  rect 110.2x51.2 smd: 1(-129.6,89.5) 3(-129.6,-89.5)
  rect 255.9x236.2 smd: 2(129.6,0)
  silkscreen extent -57,-132 178,132
TP-40 [mil] "测试点直径1mm"
  round 40 smd: 1(0,0)
TSSOP-20 [mil] "TI package PW-20,0.65mm pitch, body 6.5mmX4.4mm"
  rect 62.99x12 smd: 1(-120,115.16) 2(-120,89.57) 3(-120,63.98) 4(-120,38.39) 5(-120,12.8) 6(-120,-12.8) 7(-120,-38.39) 8(-120,-63.98) 9(-120,-89.57) 10(-120,-115.16) 11(120,-115.15) 12(120,-89.56) 13(120,-63.97) 14(120,-38.38) 15(120,-12.79) 16(120,12.8) 17(120,38.39) 18(120,63.98) 19(120,89.57) 20(120,115.16)
  silkscreen extent -125,-140 80,139, body extent -126,-128 126,128, height 41
VIAD1.8M1.3MM [mm]
  round 1.8 hole 1.3: 1(-0.281,-1.534)

## Part data
C1: library part 470UF, "容值:470uF;精度:±20%;额定电压:35V;纹波电流:286mA@120Hz;等效串联电阻(ESR):-;", Equivalent Series Resistance(ESR)=-, JLCPCB Part Class="Extended Part", LCSC Part Name="470uF ±20% 35V", Manufacturer=ROQANG(容强), ManufacturerPart=RVT1V471M1010, Operating Temperature=-40℃~+105℃, Ripple Current=286mA@120Hz, Tolerance=±20%, Voltage Rating=35V, AddInBom=yes, ConvertToPcb=yes, Datasheet=https://atta.szlcsc.com/upload/public/pdf/source/20210128/C72519_A1B8ED607B11AD36B70B1D23AFC8819E.pdf, Device=RVT1V471M1010_C72519, Diameter=10mm, FootprintName=CAP-SMD_BD10.0-L10.3-W10.3-LS11.0-R-RD, Height - Seated (Max)=10.2mm, Lifetime=2000hrs@105℃, ModelId=1ded6976ebcc49a492e53070078a8da6聨0819f05c4eef4c71ace90d822a990e87, ModelName=CAP-SMD_BD10.0-L10.3-W10.3-LS11.3-FD-1, ModelTransform=444.881,405.511,0,180,0,0,0,0,0, Supplier=LCSC, Supplier Footprint=SMD,D10xL10.2mm, SupplierPart=C72519, Symbol=RVT1V471M1010-C72519
C3 C4: library part 100UF, "容值:100uF;精度:±20%;额定电压:35V;纹波电流:90mA@120Hz;等效串联电阻(ESR):-;", Equivalent Series Resistance(ESR)=-, JLCPCB Part Class="Extended Part", LCSC Part Name="100uF ±20% 35V", Manufacturer=KNSCHA(科尼盛), ManufacturerPart=VT100UF35V34RV0158, Operating Temperature=-55℃~+105℃, Ripple Current=90mA@120Hz, Tolerance=±20%, Voltage Rating=35V, AddInBom=yes, ConvertToPcb=yes, Datasheet=https://item.szlcsc.com/datasheet/VT100UF35V34RV0158/3103840.html, Device=VT100UF35V34RV0158, Diameter=6.3mm, FootprintName=CAP-SMD_BD6.3-L6.6-W6.6-LS7.2-FD_3, Height - Seated (Max)=5.4mm, Lifetime=2000hrs@105℃, ModelId=0fb5a32acd664192a8ced5dba101c72a聨0819f05c4eef4c71ace90d822a990e87, ModelName=CAP-SMD_BD6.3-L6.6-W6.6-H5.4-LS7.2-FD, ModelTransform=283.464,259.842,0,0,0,0,0,0,0, Supplier=LCSC, Supplier Footprint=SMD,D6.3xL5.4mm, SupplierPart=C2887272, Symbol=RVT100UF35V34RV0158
C5 C8 C11 C15 C16 C27 C28 C29 C33 C34 C35 C36 C37 C38 C39: library part C0603, "贴片电容", Package=C0603
C6 C7 C17 C30 C31 C32: library part C0805, "贴片电容", Package=C0805
C9 C10 C12 C13 C14 C18 C19 C20 C21 C22 C23 C24 C25 C26: library part C1210, "贴片电容", Package=1210
CN1: "插针结构:1x6P;间距:1.25mm;安装方式:卧贴;参考系列:GH;总PIN数:6P;排数:1;每排PIN数:6;行距:-;额定电流:1A;触头材质:磷青铜;触头镀层:锡;工作温度:-25℃~+85℃;", Color=米色, Current Rating=1A, Flame Retardant Rating=UL94V-0, JLCPCB Part Class="Extended Part", LCSC Part Name="米色 1x6P 间距:1.25mm 卧贴 系列:GH", Manufacturer="SHOU HAN(首韩)", Operating Temperature=-25℃~+85℃, Voltage Rating=125V, AddInBom=yes, Contact Material=磷青铜, Contact Plating=锡, ConvertToPcb=yes, Datasheet=https://item.szlcsc.com/datasheet/SH-GH1.25-6PWB/44255911.html, Device=SH-GH1.25-6PWB, FootprintName=SW-SMD_SH-GH1.25-6PWB, ManufacturerPart=SH-GH1.25-6PWB, ModelId=e09572dfa6674d54b7c86450513a2389聨0819f05c4eef4c71ace90d822a990e87, ModelName=SW-SMD_SH-GH1.25-6PWB, ModelTransform=423.6212,188.976,0,0,0,0,0.001,-12.675,0, Mounting Type=卧贴, Number of Pins=6P, Number of PINs Per Row=6, Number of Rows=1, Pins Structure=1x6P, Pitch=1.25mm, Plastic Material=LCP, Reference Series=GH, Row Spacing=-, Supplementary Features=-, Supplier=LCSC, Supplier Footprint=SMD,P=1.25mm,卧贴, SupplierPart=C42372473, Symbol=SH-GH1.25-6PWB
CN2: "插针结构:1x4P;间距:1.25mm;安装方式:卧贴;参考系列:GH;总PIN数:4P;排数:1;每排PIN数:4;额定电流:1A;触头材质:磷青铜;触头镀层:锡;工作温度:-25℃~+85℃;", Color=米黄色, Current Rating=1A, Flame Retardant Rating=UL94V-0, JLCPCB Part Class="Extended Part", LCSC Part Name="1x4P 间距:1.25mm 卧贴 系列:GH", Manufacturer=LAILAN(莱联), Operating Temperature=-25℃~+85℃, Voltage Rating=50V, AddInBom=yes, Contact Material=磷青铜, Contact Plating=锡, ConvertToPcb=yes, Datasheet=https://item.szlcsc.com/datasheet/LAIL-PHC1.25-4P-01-GH-WT/58431077.html, Device=LAIL-PHC1.25-4P-01-GH-WT, FootprintName=CONN-SMD_4P-P1.25_HCTL_HC-GH-4PWTKK, ManufacturerPart=LAIL-PHC1.25-4P-01-GH-WT, ModelId=be1f9715b107443eaa221cf46be59155聨0819f05c4eef4c71ace90d822a990e87, ModelName=CONN-SMD_4P-P1.25_HCTL_HC-GH-4PWTKK, ModelTransform=326.771,190.9445,0,0,0,0,0,-8.858,0, Mounting Type=卧贴, Number of Pins=4P, Number of PINs Per Row=4, Number of Rows=1, Pins Structure=1x4P, Pitch=1.25mm, Plastic Material=LCP, Reference Series=GH, Supplementary Features=辅助焊脚, Supplier=LCSC, Supplier Footprint=SMD,P=1.25mm,卧贴, SupplierPart=C54905900, Symbol=LAIL-PHC1.25-4P-01-GH-WT, X-Length of Bottom Edge on Board (Spacing Line)=8.25mm, Y-Width of Bottom Edge on Board=4.9mm, Z-Height of the Board=4.4mm
CON1: "电源连接器/插头 15A 500VDC"
D1: library part BZT52C10_C2103, "二极管配置:1个独立式;稳压值(标称值):10V;稳压值(范围):9.4V~10.6V;耗散功率(Pd):500mW;", JLCPCB Part Class="Extended Part", LCSC Part Name="独立式 耐压:10V 电流:0.2uA", Manufacturer=CJ(江苏长电/长晶), Operating Junction Temperature Range=-55℃~+150℃, Pd - Power Dissipation=500mW, Reverse Leakage Current (Ir)=200nA, Tolerance=-, Zener Voltage(Nom)=10V, Zener Voltage(Range)=9.4V~10.6V, AddInBom=yes, ConvertToPcb=yes, Datasheet=https://item.szlcsc.com/datasheet/BZT52C10/2460.html, Device=BZT52C10_C2103, Diode Configuration=1个独立式, FootprintName=SOD-123_L2.8-W1.8-LS3.7-RD, Impedance(Zzk)=150Ω, Impedance(Zzt)=20Ω, ManufacturerPart=BZT52C10, ModelId=7884390a25fb4c08947731ebfba7e3f8聨0819f05c4eef4c71ace90d822a990e87, ModelName=SOD-123_L2.8-W1.8-LS3.7-RD, ModelTransform=144.8816,62.992,0,0,0,0,0,0,0, Supplier=LCSC, Supplier Footprint=SOD-123, SupplierPart=C2103, Symbol=BZT52C10
D2 D3 D4 D5 D6 D7: library part 1N4148W_C7420318, "二极管配置:独立式;整流电流:150mA;直流反向耐压(Vr):100V;正向压降(Vf):1.25V@150mA;反向恢复时间(Trr):4ns;", Current - Rectified=150mA, JLCPCB Part Class="Extended Part", LCSC Part Name="100V 150mA", Manufacturer=R+O(宏嘉诚), Non-Repetitive Peak Forward Surge Current=2A, Operating Junction Temperature Range=-55℃~+150℃, Pd - Power Dissipation=400mW, Reverse Leakage Current (Ir)=1uA@75V, Voltage - DC Reverse(Vr)=100V, Voltage - Forward(Vf@If)=1.25V@150mA, AddInBom=yes, ConvertToPcb=yes, Datasheet=https://item.szlcsc.com/datasheet/1N4148W/8397140.html, Device=1N4148W_C7420318, Diode Configuration=独立式, FootprintName=SOD-123_L2.7-W1.6-LS3.7-FD, ManufacturerPart=1N4148W, ModelId=5054d9b7be8b429dad093a54b517b4dd聨0819f05c4eef4c71ace90d822a990e87, ModelName=SOD-123_L2.7-W1.6-LS3.7-FD, ModelTransform=145.669,61.024,0,0,0,0,0,0,0, Reverse Recovery Time (trr)=4ns, Supplier=LCSC, Supplier Footprint=SOD-123, SupplierPart=C7420318, Symbol=1N4148W_C7420318
FB1: library part FB_0603, "磁珠  阻抗@频率 220Ω@100MHz  / 误差 ±25% 直流电阻(DCR) 50mΩ  / 额定电流 2.2A  工作温度 -55℃~+125℃", Package=0603, SuppliersPartNumber=C88980
J1 J2 J3: library part VIAHole, "通用过孔"
J4 J5: JLCPCB Part Class="Extended Part", AddInBom=yes, ConvertToPcb=yes, Device=3710F60037G0FR01, FootprintName=CONN-TH_60P-P0.80_3710F60037G0FR01, LCSC Part Name=3710F60037G0FR01, ManufacturerPart=3710F60037G0FR01, ModelId=ea88157e74564cd790d3fb822bd5b75b聨0819f05c4eef4c71ace90d822a990e87, ModelName=CONN-TH_60P-P0.80_3710F60037G0FR01, ModelTransform=1170.864,236.22,0,0,0,0,-0.003,0.006,-27.559, Supplier=LCSC, Supplier Footprint=SMD,P=0.8mm, SupplierPart=C9900157213, Symbol=3710F60037G0FR01
L1: library part MWSA0603S-6R8MT, "电感值:6.8uH;精度:±20%;额定电流:5A;饱和电流(Isat):6A;类型:-;", Current - Saturation(Isat)=6A, Current Rating=5A, DC Resistance(DCR)=48mΩ, JLCPCB Part Class="Extended Part", LCSC Part Name="6.8uH ±20% 6A", Manufacturer=Sunlord(顺络), Ratings=-, Tolerance=±20%, AddInBom=yes, ConvertToPcb=yes, Datasheet=https://item.szlcsc.com/datasheet/MWSA0603S-6R8MT/397801.html, Device=MWSA0603S-6R8MT, FootprintName=IND-SMD_L7.0-W6.6, ManufacturerPart=MWSA0603S-6R8MT, ModelId=6860c29aec394a38a0f014af7f722a42聨0819f05c4eef4c71ace90d822a990e87, ModelName=IND-SMD_L7.0-W6.6-H3.0, ModelTransform=275.59,259.88137,0,0,0,0,0,0,0, Supplier=LCSC, Supplier Footprint=SMD,7x6.6mm, SupplierPart=C408449, Symbol=MWSA0603S-6R8MT, Type=-
LED1 LED2: library part LED_0603_G, "灯头类型:1.6mmx0.8mm方形灯头;发光颜色:黄绿色;正向压降(Vf):1.9V~2.1V;功率:60mW;正向电流:20mA;波长:565nm~575nm;二极管配置:独立二极管;透镜颜色:无色透明透镜;色温:-;发光强度:80mcd;发光角度:120°;载带方式:-;工作温度:-40℃~+85℃;", Color Temperature=-, Forward Current=20mA, Illumination Color=黄绿色, JLCPCB Part Class="Extended Part", LCSC Part Name=0603普绿0.6T（金版）, Lens Color=无色透明透镜, Manufacturer=XINGLIGHT(成兴光), Operating Temperature=-40℃~+85℃, Power(Watts)=60mW, Voltage - Forward(Vf)=1.9V~2.1V, AddInBom=yes, ConvertToPcb=yes, Datasheet=https://item.szlcsc.com/datasheet/XL-J1608SYGC-06/50855282.html, Device=XL-J1608SYGC-06, Diode Configuration=独立二极管, FootprintName=LED0603-FD_GREEN, Lamp Holder Type=1.6mmx0.8mm方形灯头, Luminous Intensity=80mcd, ManufacturerPart=XL-J1608SYGC-06, ModelId=1ce04384e8434edd9926301526d5d892聨0819f05c4eef4c71ace90d822a990e87, ModelName=LED0603-FD_GREEN, ModelTransform=62.992,31.8897,0,0,0,0,0,0,0, Mounting Style=-, Peak Wavelength=570nm, Supplier=LCSC, Supplier Footprint=SMD, SupplierPart=C48586672, Symbol=XL-J1608SYGC-06, Viewing Angle=120°, Wavelength - Dominant=565nm~575nm
Q1: "数量:1个P沟道;漏源电压(Vdss):40V;连续漏极电流(Id):6A;导通电阻(RDS(on)):32mΩ@10V；42mΩ@4.5V;耗散功率(Pd):2.5W;阈值电压(Vgs(th)):1.7V;", Current - Continuous Drain(Id)=6A, Drain to Source Voltage=40V, Gate Threshold Voltage (Vgs(th))=1.7V, Input Capacitance(Ciss)=1.25nF, JLCPCB Part Class="Extended Part", LCSC Part Name=P沟道MOSFET, Manufacturer=R+O(宏嘉诚), Operating Temperature=-55℃~+150℃, Output Capacitance(Coss)=98pF, Pd - Power Dissipation=2.5W, Reverse Transfer Capacitance (Crss@Vds)=80pF, AddInBom=yes, Configuration=-, ConvertToPcb=yes, Datasheet=https://item.szlcsc.com/datasheet/HV04P440S/51692181.html, Device=HV04P440S, FootprintName=SOT-89-3_L4.5-W2.4-P1.50-LS4.0-BR, Gate Charge(Qg)=23nC@10V, ManufacturerPart=HV04P440S, ModelId=dde435042bae4b9691e74da94cf9d9f3聨0819f05c4eef4c71ace90d822a990e87, ModelName=SOT-89-3_L4.5-W2.4-P1.50-LS4.0-BR, ModelTransform=177.165,161.417,0,90,0,0,-2.323,0,0, Number=1个P沟道, RDS(on)=32mΩ@10V；42mΩ@4.5V, Supplier=LCSC, Supplier Footprint=SOT-89, SupplierPart=C49256781, Symbol=HV04P440S, Type=P沟道
Q2 Q3 Q4 Q5 Q6 Q7: "数量:1个N沟道;漏源电压(Vdss):40V;连续漏极电流(Id):13A；50A;导通电阻(RDS(on)):7mΩ@10V;耗散功率(Pd):2.3W；50W;阈值电压(Vgs(th)):2.6V;", Current - Continuous Drain(Id)=13A；50A, Drain to Source Voltage=40V, Gate Threshold Voltage (Vgs(th))=2.6V, Input Capacitance(Ciss)=1.8nF, JLCPCB Part Class="Extended Part", LCSC Part Name="1个N沟道 耐压:40V 电流:13A 50A", Manufacturer=AOS, Operating Temperature=-55℃~+175℃, Output Capacitance(Coss)=215pF, Pd - Power Dissipation=2.3W；50W, Reverse Transfer Capacitance (Crss@Vds)=135pF, AddInBom=yes, Configuration=-, ConvertToPcb=yes, Datasheet=https://item.szlcsc.com/datasheet/AOD4184A/100337.html, Device=AOD4184A, FootprintName=TO-252-2_L6.6-W6.1-P4.57-LS9.9-TL-CW, Gate Charge(Qg)=33nC@10V, ManufacturerPart=AOD4184A, ModelId=ce57f84d66384067af8a68020b6de06d聨0819f05c4eef4c71ace90d822a990e87, ModelName=TO-252-2L-3P_L6.6-W6.1-H2.3-LS10.1-P4.6, ModelTransform=259.842,390.52442,0,270,0,0,38.027,-0.598,0, Number=1个N沟道, RDS(on)=7mΩ@10V, Supplier=LCSC, Supplier Footprint=TO-252, SupplierPart=C99124, Symbol=AOD4184A, Type=N沟道, Vgs=±20V
R1 R2 R3 R4 R5 R6 R8 R9 R10 R11 R12 R13 R14 R18 R19 R20 R21 R22 R23 R27 R28 R29 R33 R34 R35 R36 R37 R38 R39 R40 R41 R42 R43 R44 R45 R46 R47 R48 R49 R50 R51 R52 R53: library part R0603, "贴片电阻", Package=R0603
R7: library part R0805, "贴片电阻", Package=R0805
R15 R16 R17 R24 R25 R26: library part R0402, "贴片电阻", Package=0402
R30 R31 R32: library part R2512, "贴片电阻", Package=R2512
TP1 TP2 TP3 TP4 TP5 TP6 TP7 TP8 TP9 TP10: "Test Point"
U1: "功能类型:降压型;工作电压:4.5V~36V;输出电压:600mV~34.2V;输出电流:3A;输出类型:可调;", Frequency - Switching=500kHz, JLCPCB Part Class="Extended Part", LCSC Part Name="降压型 3A 4.5V~36V", Manufacturer=TI(德州仪器), Operating Temperature=-40℃~+150℃@(TJ), Output Current=3A, Output Voltage=600mV~34.2V, Quiescent Current=40uA, Voltage - Supply=4.5V~36V, AddInBom=yes, ConvertToPcb=yes, Datasheet=https://item.szlcsc.com/datasheet/LMR51430XDDCR/5856347.html, Device=LMR51430XDDCR, Features=轻载高效模式；逐波限流；过流保护；打嗝限流, FootprintName=SOT-23-6_L2.9-W1.6-P0.95-LS2.8-BL, Function=降压型, ManufacturerPart=LMR51430XDDCR, ModelId=18da8f6c14a34920b3e136b5c401a119聨0819f05c4eef4c71ace90d822a990e87, ModelName=SOT-23-6_L2.9-W1.6-H1.5-LS2.8-P0.95, ModelTransform=110.236,113.364,0,90,0,0,0.0005,0.0005,0, Number of Outputs=1, Output Type=可调, Supplier=LCSC, Supplier Footprint=SOT-23-6, SupplierPart=C5185863, Switch tube (built-in/external)=内置, Symbol=LMR51430XDDCR, Synchronous Rectifier=是, Topology=降压式
U2: "AMS1117系列可调及固定电压稳压器的设计目标是提供高达1A的输出电流，且能在输入 - 输出压差低至1V的条件下工作。该器件的压差保证最大为1.3V，在负载电流较低时会降低。片上调校功能可将参考电压调整至±1.5%"
U3: "三相独立半桥驱动芯片", Package=TSSOP-20_4.4x6.5x0.65P, Notepad=扩展库
U4: "放大器数:4;轨到轨:轨到轨输入,轨到轨输出;增益带宽积(GBW):6MHz;输入失调电压(Vos):3.5mV;压摆率(SR):4.2V/us;输入偏置电流(Ib):1pA;", Ib - Input Bias Current=1pA, Input Offset Voltage Drift(Vos TC)=2.4uV/℃, Input Voltage Noise Density=13nV/√Hz@1kHz, JLCPCB Part Class="Extended Part", LCSC Part Name="6MHz 轨到轨 I/O 输出，CMOS 运算放大器", Manufacturer=Gainsil(聚洵), Operating Temperature=-40℃~+125℃, Output Current=4mA, Quiescent Current=470uA, Vos - Input Offset Voltage=3.5mV, AddInBom=yes, Common Mode Rejection Ratio(CMRR)=90dB, ConvertToPcb=yes, Datasheet=https://item.szlcsc.com/datasheet/GS8634-TR/169054.html, Device=GS8634-TR, Dual Supply=1.05V~2.75V；-2.75V~-1.05V, Features=使能/关断功能, FootprintName=SOP-14_L5.0-W4.4-P0.65-LS6.4-BL, Gain Bandwidth Product=6MHz, Input Offset Current(Ios)=1pA, ManufacturerPart=GS8634-TR, ModelId=20b40d9ace5d4e70abc2a10921399e11聨0819f05c4eef4c71ace90d822a990e87, ModelName=SOP-14_L5.0-W4.4-H1.0-LS6.4-P0.65, ModelTransform=236.714,196.85,0,90,0,0,0,0,0, Number of Channels=4, Rail to Rail=轨到轨输入,轨到轨输出, Relevance=|, Single supply=2.1V~5.5V, Slew Rate=4.2V/us, Supplier=LCSC, Supplier Footprint=TSSOP-14, SupplierPart=C157706, Symbol=GS8634-TR
H1 H2: AddInBom=yes, ConvertToPcb=yes, Device=HDR-F_2.54_1x3P, FootprintName=HDR-TH_3P-P2.54-V-F, ModelId=f3b3cc5aae9641bf9e56fc160cef875b聨0819f05c4eef4c71ace90d822a990e87, ModelName=HDR2.54-F-LI-1X3P, ModelTransform=299.9994,100,0,0,0,0,0,0,-118.11, Supplier Footprint=插件, SupplierPart=C541850, Symbol=PM254V-11-03-H85

## Via types
v1: diameter 23.62, hole 11.81, Top Layer to Bottom Layer, 310 vias

## Nets (pads, with @x,y where several pads share a name; then routed paths per layer and width w, separated by ;. In a path a pad name is that pad's centre, name@x,y a point inside that pad or via, vN(x,y) a via of type N, cw(c..) or ccw(c..) an arc to the next point about the centre after c; other vN are vias at no path point)
3V3A: C16.1 C17.1 C34.1 FB1.2 R43.2 U4.4 | length 1231.4
  Top Layer w10: v1(1055,1195) 1056.81,1196.81 1081.81,1196.81 1145,1260 v1(1145,1325)
  Top Layer w15: v1(1145,1325) 1190,1325 1440,1575 1440,1882.48 1342.95,1979.53 R43.2@1340,1979.53
  Bottom Layer w10: v1(1055,1195) 1057.61,1192.39 1057.61,1182.39 1097.32,1142.68 1136.49,1142.68 U4.4@1139.17,1140 ; v1(1145,1325) C34.1@1145,1415.47
+3V3: C14.1 C15.1 CN1.6 CN2.1 FB1.1 R39.1 R40.1 R41.1 TP4.1 U2.2 | length 5271.6
  Top Layer w15: TP4.1@415,1915 628.11,1915 U2.2@630,1916.89 ; v1(575,1805) 575,1230 745,1060 745,785 1020,510 1069.4,510 v1(1069.56,510.16) ; R39.1@2450,955.47 R40.1@2510,955.47 ; v1(3355,510) 2958.43,510 2512.95,955.47 R40.1@2510,955.47 ; v1(3355,545) 2980.47,545 2607.5,917.97 2607.5,920.93 2572.95,955.47 R41.1@2570,955.47 R40.1@2510,955.47 ; v1(3390,510) 3724,510 3765,469 3765,325 3752.5,312.5 3712.4,312.5 CN2.1@3706.1,306.2 ; v1(3390,545) 3524.38,545 3772.3,792.92 3772.3,1055.1 3757.34,1070.06 3754.19,1070.06 3736.65,1087.6 CN1.6@3715,1087.6
  other v1: 1104.56,510.16 1069.56,545.16 1104.56,545.16 610,1805 645,1805 679.92,1805.53 575,1840 610,1840 645,1840 680,1840
+5V: C9.1 C10.1 C11.1 C12.1 C13.1 J4.58 J4.59 J4.60 L1.2 R4.2 R5.2 TP3.1 U2.3 | length 400.5
  Top Layer w10: L1.2@976.8,2350 976.8,2334.25 1076.05,2235 R4.2@1320.47,2235
  other v1: 235,2260 260,2260 285,2260 235,2285 260,2285 285,2285 235,2310 260,2310 285,2310